# Altium PCB PCB1.PcbDoc (part 8 of 8)
Units mil, origin at the board's own origin, x right, y up, seen from the top; angles counter-clockwise.
Board outline 1968.5 x 1968.5 mil, 4 copper layers (Top Layer, Layer 1, Layer 2, Bottom Layer), stack 23.756 mil thick; 223 components, 143 nets, 652 pads, 329 vias.
Unrouted connection lines stored in the file: 15.
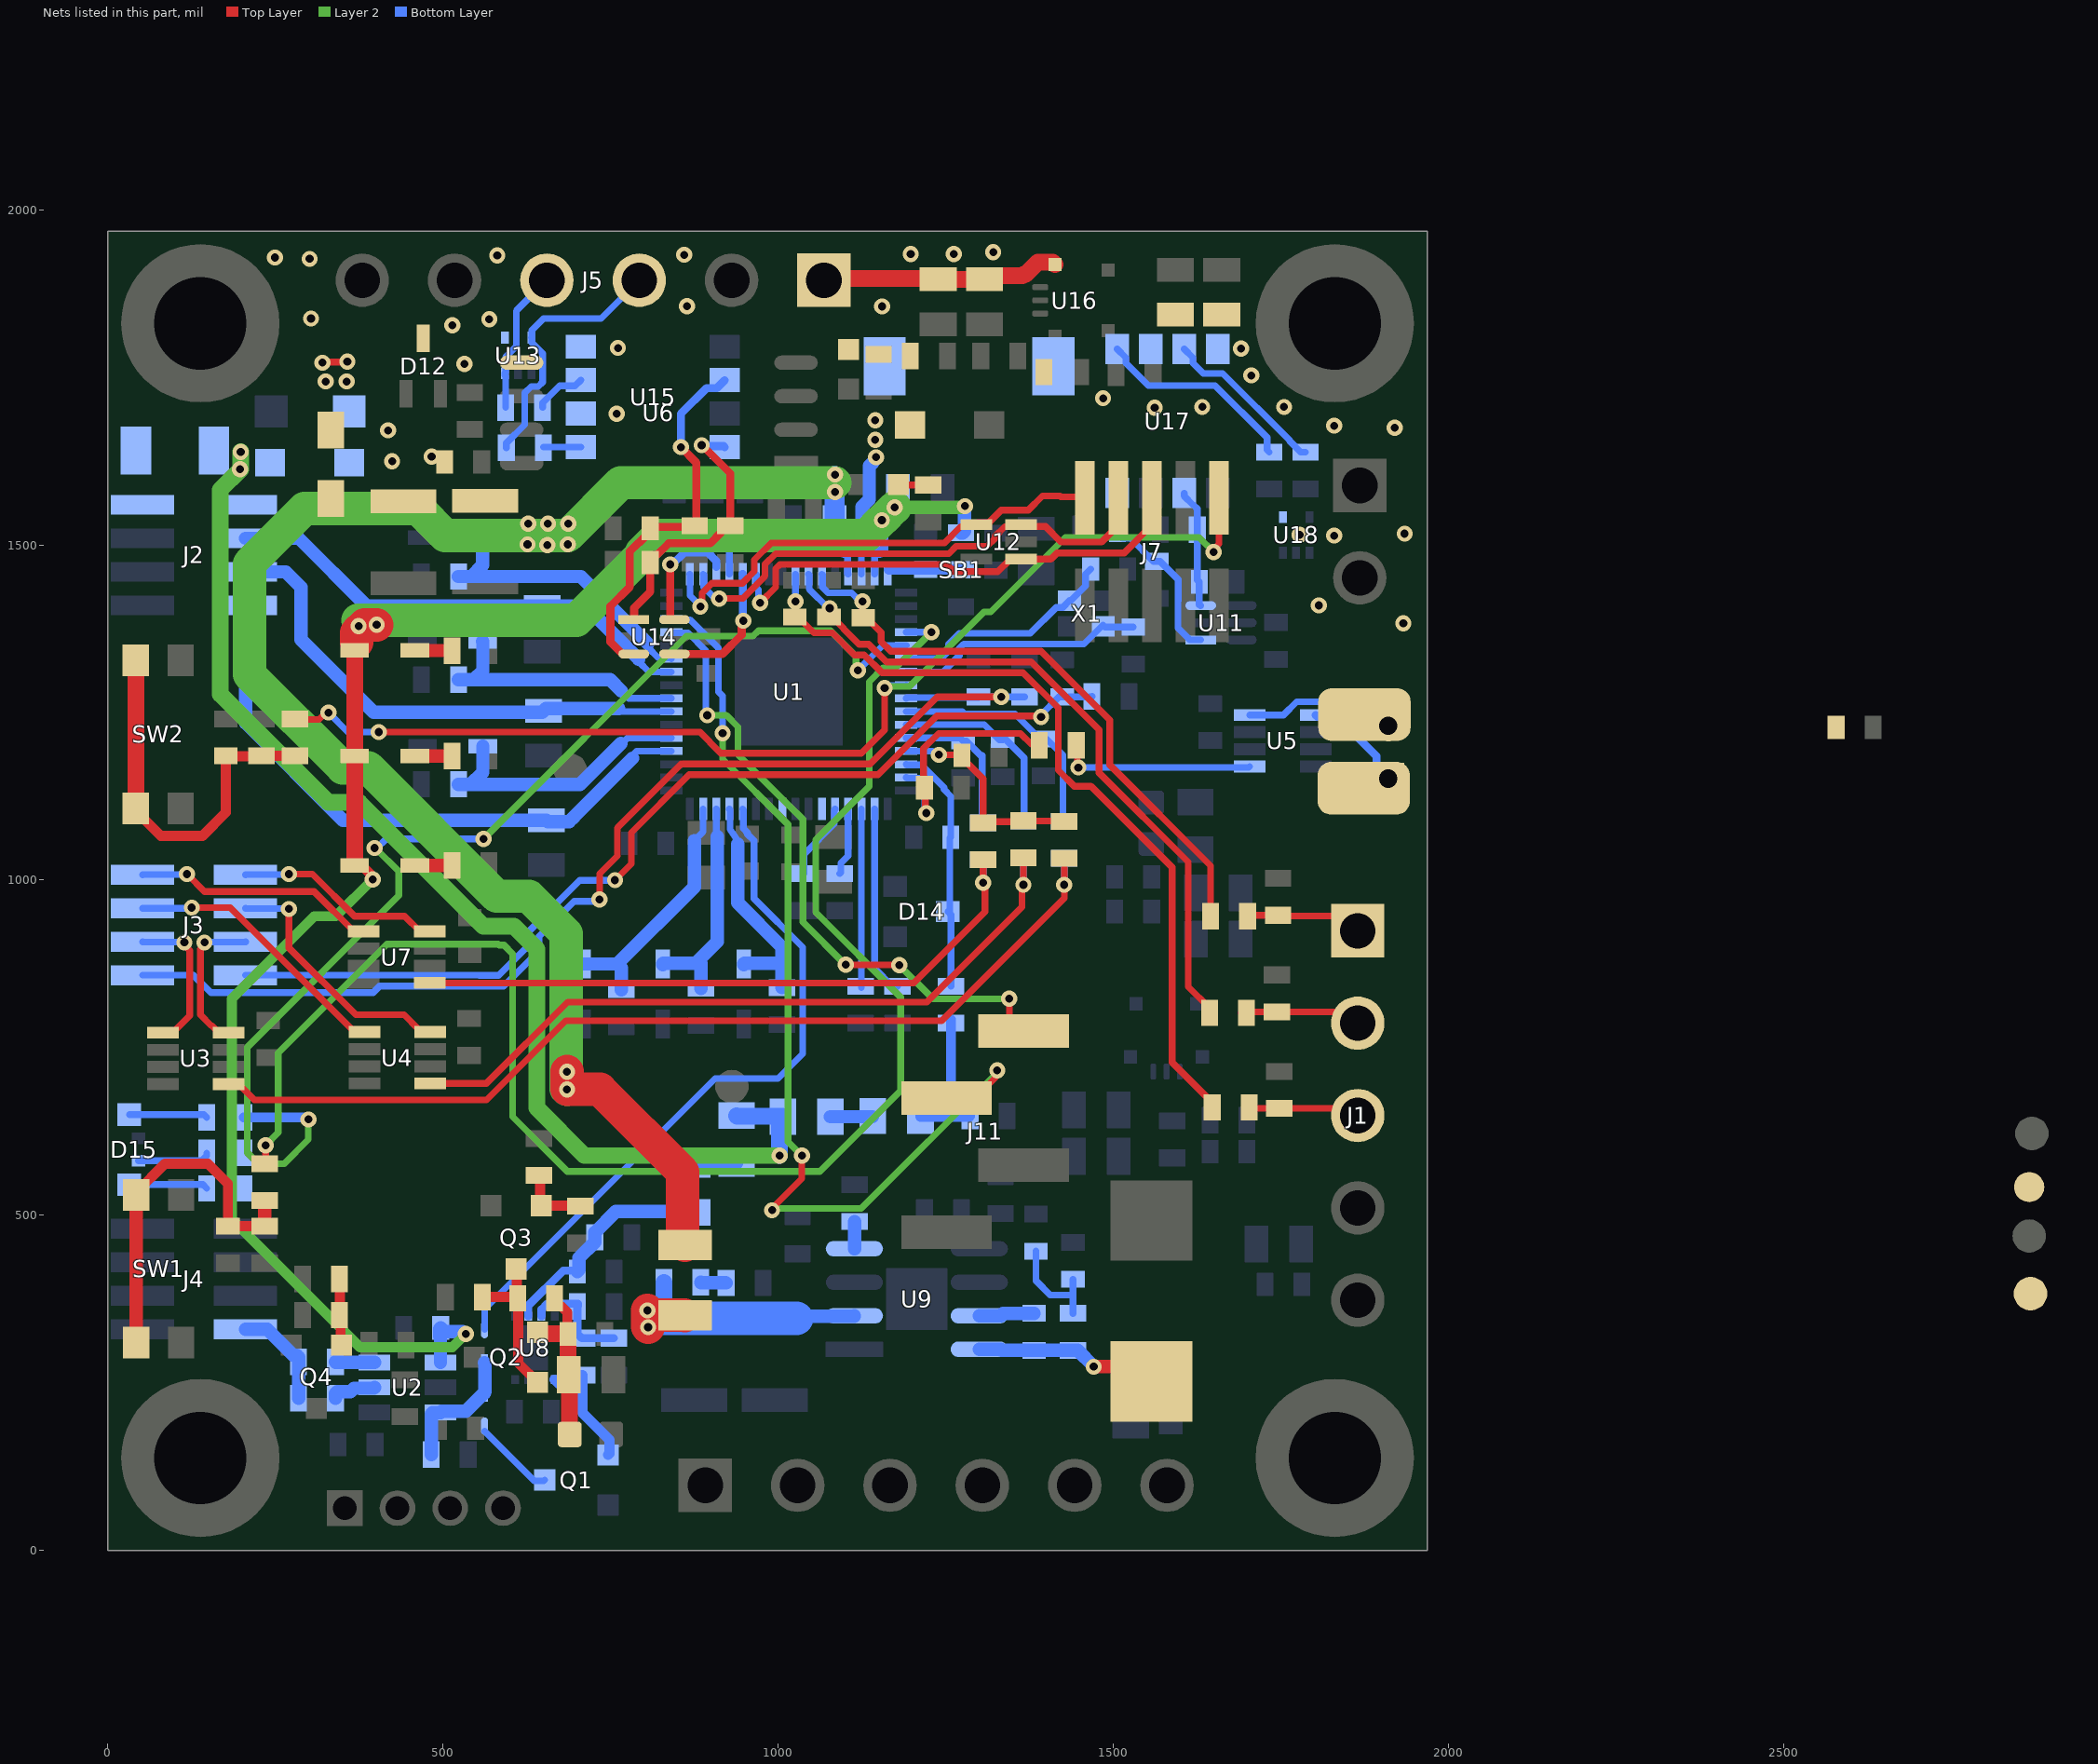
[diagram p5: the nets of this part, all layers, seen from the top]

## Via types
v1: diameter 24, hole 12, Top Layer to Bottom Layer, tented both sides, 329 vias

## Nets (pads, with @x,y where several pads share a name; then routed paths per layer and width w, separated by ;. In a path a pad name is that pad's centre, name@x,y a point inside that pad or via, vN(x,y) a via of type N, cw(c..) or ccw(c..) an arc to the next point about the centre after c; other vN are vias at no path point) (continued)
GND_EXT: C65.1 C66.1 C67.1 C68.1 C69.1 C70.1 D12.3 J5.1 R80.1 R81.1 TP6.1 U6.5 U13.4 U15.2 U15.4 U16.4 U17.2 U17.4 U18.4 | length 351.5
  Top Layer w25: J5.1@1068.39,1895 1070.85,1897.46 1238,1897.46 C66.1@1239,1896.46 ; C66.1@1240,1896.46 C67.1@1308,1896.46 ; C67.1@1314,1896.46 1319.22,1901.68 1364.48,1901.68 1366.89,1904.08 1369.56,1904.08 1387.62,1922.15 1409.84,1922.15 U16.4@1413.34,1918.64
  other v1: 1933,1383 1807,1410 1830,1514 1778,1515 1935,1517 424,1625 483,1632 418,1671 1920,1675 1830,1678 759,1696 1562,1705 1633,1706 1755,1706 1485,1719 1706,1753 532,1770 1691,1793 761,1794 514,1828 569,1837 303,1838 1155,1856 864,1856.5 301,1927 249,1929 581,1932 860,1933 1198,1934 1262,1934 1321,1937
GOV: J4.7 R62.1 R63.1 | length 157.6
  Bottom Layer w20: J4.7@205.27,330 237.75,330 277.07,290.69 281.84,290.69 284.44,288.09 R63.1@284.44,281 R62.1@284.44,227
HALL1_IN: J1.3 R44.1 R47.1 | length 167.1
  Top Layer w10: R47.1@1703,661 1704.56,659.44 1854.35,659.44 J1.3@1865,648.8
HALL2_IN: J1.2 R45.1 R48.1 | length 177.6
  Top Layer w10: R48.1@1691.56,802 1693,803.44 R45.1@1741,803.44 ; R45.1@1744.44,803.44 1829.28,803.44 1846.13,786.59 J1.2@1865,786.59
HALL3_IN: J1.1 R46.1 R49.1 | length 174.6
  Top Layer w10: R49.1@1700.56,946 1702,947.44 R46.1@1746,947.44 1747,946.44 1842.94,946.44 J1.1@1865,924.39
HSE_IN: C6.2 U1.6 X1.1 | length 346.9
  Bottom Layer w10: U1.6@1191.2,1330.41 1243.12,1330.41 1254.48,1341.77 1254.48,1352.34 1270.3,1368.16 1376.16,1368.16 1414.92,1406.92 1424.67,1406.92 X1.1@1434.92,1417.17 1436.89,1417.17 1458.84,1439.13 1458.84,1456.4 C6.2@1466.44,1464
HSE_OUT: C7.2 U1.7 X1.3 | length 375.2
  Bottom Layer w10: U1.7@1191.2,1310.73 1246.06,1310.73 1270.48,1335.14 1270.48,1345.71 1276.92,1352.16 1456.44,1352.16 1484.84,1380.56 1487.84,1377.56 C7.2@1530,1377.56
I_SENSE_A: C24.2 R23.2 U1.10 | length 355.6
  Bottom Layer w10: U1.10@1191.2,1251.67 1275.09,1251.67 1278.78,1247.99 1353.65,1247.99 1391.08,1210.56 C24.2@1396,1210.56 ; C24.2@1400.92,1210.56 1425,1186.48 1425,1089.56 R23.2@1427,1087.56
I_SENSE_B: C26.2 R25.2 U1.11 | length 286.3
  Bottom Layer w10: U1.11@1191.2,1231.99 1307.65,1231.99 1330.08,1209.56 C26.2@1335,1209.56 ; C26.2@1339.92,1209.56 1367,1182.48 1367,1088.56 R25.2@1366,1088.56
I_SENSE_C: C28.2 R26.2 U1.12 | length 225.8
  Bottom Layer w10: U1.12@1191.2,1212.3 1271.26,1212.3 C28.2@1276,1207.56 1280.92,1207.56 1302.52,1185.96 1304.52,1185.96 1304.52,1086.04 1305.52,1086.04 R26.2@1306,1085.56
IIN+: J10.2 pad.3@1875,1247 U5.8 | length 229.8
  Bottom Layer w10: U5.8@1703.79,1246.39 1754.18,1246.39 1774.03,1266.24 1835.76,1266.24 1871.63,1230.37 J10.2@1910.54,1230.37
IIN-: J10.1 pad.3@1874,1137 U5.1 | length 156.6
  Bottom Layer w12: U5.1@1802.21,1246.39 1804.66,1243.94 1833.7,1243.94 1892.92,1184.72 1892.92,1169.25 J10.1@1910.54,1151.63
INV_DRIVE_MCU: U1.53 U14.4 | length 203.8
  Top Layer w12: U14.4@845.32,1337.41 849.32,1337.41 916.94,1337.41 945.7,1366.17 945.7,1384.7 v1(948,1387)
  Bottom Layer w12: U1.53@947.1,1456.4 947.2,1456.3 947.2,1387.8 v1(948,1387)
INV_ENABLE_MCU: U1.51 U14.6 | length 178.9
  Top Layer w12: v1(839,1471) 839,1389.15 839.56,1388.59 U14.6@845.32,1388.59
  Bottom Layer w12: v1(839,1471) 842.25,1471 860.08,1488.83 895.22,1488.83 907.64,1476.41 U1.51@907.64,1467.13
JTAG_SWCLK: J7.4 U1.50 U12.3 | length 765.6
  Top Layer w10: v1(912.15,1420) 912.6,1420.45 947.45,1420.45 980.48,1453.48 980.48,1471.34 996.3,1487.16 1254.79,1487.16 1265.63,1498 1312,1498 1324,1510 1324,1513.15 1338.29,1527.43 1359.75,1527.43 U12.3@1362.62,1530.31 1365.21,1527.72 1398.95,1527.72 1422.47,1504.2 1482.43,1504.2 1508,1529.76 J7.4@1508,1570.12
  Bottom Layer w10: U1.50@888.05,1456.4 888.95,1455.49 888.95,1436.98 903.26,1422.68 909.47,1422.68 v1(912.15,1420)
JTAG_SWDIO: J7.2 U1.49 U12.4 | length 719
  Top Layer w10: v1(884,1408) 886.68,1410.68 886.68,1428.34 901.34,1443 946.85,1443 964.48,1460.63 964.48,1477.97 989.67,1503.16 1248.16,1503.16 1272.43,1527.43 1292.82,1527.43 1298.57,1533.18 1314.31,1533.18 1333.13,1552 1373.33,1552 1394.48,1573.15 1420.85,1573.15 1422.07,1571.93 1456.18,1571.93 J7.2@1458,1570.12
  Bottom Layer w10: U1.49@868.36,1456.4 868.54,1456.22 868.54,1424.66 884,1409.2 v1(884,1408)
JTAG_SWO: J7.6 U1.54 U12.1 | length 743.7
  Top Layer w10: v1(973.26,1413.74) 996.48,1436.95 996.48,1464.71 1002.92,1471.16 1251.84,1471.16 1262.75,1460.25 1328,1460.25 1346.87,1479.13 U12.1@1362.62,1479.13 1407.24,1479.13 1416.31,1488.2 1516.43,1488.2 1558,1529.76 J7.6@1558,1570.12
  Bottom Layer w10: U1.54@966.89,1456.4 967.69,1455.6 967.69,1436 970.58,1433.11 970.58,1416.42 v1(973.26,1413.74)
LED_BLUE: D15.3 R43.1 | length 109.1
  Bottom Layer w10: D15.3@45.62,581.27 139.84,581.27 147.44,588.87 R43.1@147.44,593
LED_GREEN: D15.4 R42.1 | length 118
  Bottom Layer w10: D15.4@31.84,545.83 141.61,545.83 R42.1@147.44,540
LED_RED: D15.1 R41.1 | length 117.3
  Bottom Layer w10: D15.1@31.84,650.17 143.28,650.17 R41.1@147.44,646
LM_BST: C8.2 U9.7 | length 83.3
  Bottom Layer w20: U9.7@1300.15,350 1332.28,350 1335.84,353.56 C8.2@1382,353.56
MCU_RESET: J7.10 R40.2 U1.8 | length 1697.9
  Top Layer w10: R40.2@279,1240.56 279.78,1239.78 314.99,1239.78 325.21,1250 v1(329,1250) ; v1(404,1221) 883.38,1221 898.54,1205.84 898.54,1205.38 914.6,1189.32 1124.32,1189.32 1159,1224 v1(1159,1286.47) ; v1(1649.87,1489.65) 1649.87,1493.44 1658,1501.56 J7.10@1658,1570.12
  Layer 2 w10: v1(1159,1286.47) 1161.68,1289.15 1196.11,1289.15 1307.28,1400.33 1317.56,1400.33 1428.74,1511.5 1628.02,1511.5 v1(1649.87,1489.65)
  Bottom Layer w10: v1(329,1250) 358,1221 v1(404,1221) ; v1(1159,1286.47) 1162.79,1286.47 1166.45,1290.14 1190.29,1290.14 U1.8@1191.2,1291.04
NetC10_2: C10.2 C11.2 F2.2 R12.2 U9.2 | length 422.9
  Top Layer w50: v1(805,358) 805,334 v1(806,333) ; v1@812,351 860.5,351 F2.2@861,350.5
  Bottom Layer w20: C11.2@1043,349.44 1113.29,349.44 U9.2@1113.85,350
  Bottom Layer w25: R12.2@829.44,400 829.44,350.58 C10.2@834,346.02
  Bottom Layer w50: 806.66,346.02 834,346.02 C10.2@875.02,346.02 C11.2@995.02,346.02 ; C11.2@995.02,346.02 C11.2@1028,346
NetC12_1: C12.1 C13.2 R13.1 | length 159
  Bottom Layer w10: C13.2@1385,446.44 1385,402 1406,381 1440,381 ; R13.1@1440,353.56 1440,381 ; C12.1@1440,404.44 1440,381
NetC29_2: C29.2 R27.2 U1.15 | length 364.3
  Top Layer w10: v1(1221,1100) 1219.72,1101.28 1219.72,1136.72 C29.2@1218.44,1138 1218.44,1141 1217,1142.44 1217,1196.53 1239.47,1219 1361.6,1219 1377.7,1202.9 1387.98,1202.9 R27.2@1389.88,1201
  Bottom Layer w10: U1.15@1191.2,1153.25 1192.1,1152.34 1210.61,1152.34 1218.93,1144.02 1218.93,1102.07 v1(1221,1100)
NetC40_1: C40.1 R37.1 R39.1 SW1.B1 SW1.B2 | length 548.1
  Top Layer w15: SW1.B1@42.2,530.24 42.2,534.17 85.02,577 149,577 179,547 C40.1@179,483.56 189.02,483.56 R37.1@234,483.56
  Top Layer w20: SW1.B2@42.2,309.76 SW1.B1@42.2,530.24 ; R37.1@234,483.56 R39.1@234,521.88
NetC41_1: C41.1 R38.1 R40.1 SW2.B1 SW2.B2 | length 576.7
  Top Layer w15: SW2.B2@41.54,1107.26 41.54,1103.33 78.86,1066 141,1066 176,1101 C41.1@176,1185.44 176.5,1184.94 229,1184.94 229.5,1185.44 R40.1@279,1185.44
  Top Layer w25: SW2.B2@41.54,1107.26 SW2.B1@41.54,1327.74
NetC42_2: C42.2 R47.2 U1.57 | length 1219.4
  Top Layer w10: v1(1026,1416) 1026,1393.44 C42.2@1025,1392.44 1029.92,1392.44 1053.52,1368.84 1081.16,1368.84 1114,1336 1128.53,1336 1155.05,1309.47 1365.53,1309.47 1418,1257 1418,1164 1442,1140 1467,1140 1588,1019 1588,727.97 1647.88,668.09 R47.2@1647.88,661
  Bottom Layer w10: U1.57@1025.84,1456.4 1025.92,1456.32 1025.92,1416.08 v1(1026,1416)
NetC43_2: C43.2 R48.2 U1.58 | length 1042.3
  Top Layer w10: v1(1077,1405.66) 1076,1404.66 C43.2@1076,1392.44 1080.92,1392.44 1097.85,1375.51 1097.85,1374.91 1120.77,1352 1135.15,1352 1161.68,1325.47 1377.9,1325.47 1479,1224.37 1479,1160 1612,1027 1612,840.97 1643.88,809.09 R48.2@1643.88,802
  Bottom Layer w10: U1.58@1045.53,1456.4 1046.43,1455.49 1046.43,1434.04 1074.81,1405.66 v1(1077,1405.66)
NetC44_2: C44.2 R49.2 U1.59 | length 907.7
  Top Layer w10: v1(1126,1415.96) 1126,1392.44 C44.2@1127,1391.44 1131.92,1391.44 1153.91,1369.45 1153.91,1355.87 1168.31,1341.47 1392.53,1341.47 1495,1239 1495,1172 1645.44,1021.56 R49.2@1645.44,946
  Bottom Layer w10: U1.59@1065.21,1456.4 1066.12,1455.49 1066.12,1436.98 1074.44,1428.66 1109.51,1428.66 1122.21,1415.96 v1(1126,1415.96)
NetC46_2: C46.2 R59.1 R61.2 U8.2 | length 339
  Bottom Layer w12: U8.2@627.16,349.24 627.25,349.34 627.25,365.19 679.19,417.13 699.31,417.13 C46.2@700.44,416
  Bottom Layer w20: C46.2@700.44,416 703.04,418.6 703.04,436.51 726.44,459.91 726.44,474.09 757.84,505.49 871,505.49 R59.1@872,504.49
NetC56_1: C56.1 C57.2 L4.2 Q2.2 R64.1 | length 261.5
  Top Layer w15: R64.1@666.56,376 666.56,368.91 671.66,363.81 676.74,363.81 685.53,355.03 685.53,323.91 C57.2@686.44,323
  Top Layer w25: Q2.2@641.24,325.4 643.65,323 C57.2@686.44,323 686.54,322.9 686.54,262 688.32,260.22 688.32,173.78 L4.2@689.09,173
NetC61_1: C61.1 R72.1 U11.3 U17.6 | length 179.1
  Bottom Layer w10: U17.6@1606,1577.52 1606,1572.99 1618.91,1560.08 1619.7,1560.08 1625.56,1554.22 R72.1@1625.56,1523 1625.56,1447.88 C61.1@1628.44,1445 1628.44,1411.08 1629.93,1409.59 U11.3@1630.68,1409.59
NetC62_1: C62.1 R75.1 U14.3 U15.6 | length 569.2
  Top Layer w12: U14.3@784.68,1337.41 784.45,1337.64 767.42,1337.64 749.77,1355.29 749.77,1408.48 778.68,1437.38 778.68,1490.57 791.63,1503.52 792.64,1503.52 809.2,1520.08 C62.1@809.2,1525 810.96,1526.76 873.7,1526.76 R75.1@875.46,1528.52 875.46,1532.58 878,1535.12 878,1623 v1(855,1646)
  Bottom Layer w12: v1(855,1646) 855,1696 893.09,1734.09 908.57,1734.09 U15.6@920.48,1746
NetC63_1: C63.1 R74.1 U14.1 U15.8 | length 416.4
  Top Layer w12: U14.1@784.68,1388.59 785.17,1389.08 785.17,1406.17 809.2,1430.2 809.2,1478.92 815.79,1485.52 819.58,1485.52 836.52,1502.47 898.66,1502.47 914.77,1518.58 914.77,1521.92 921.37,1528.52 R74.1@928.46,1528.52 928.46,1607.08 886.55,1648.99 v1(885.95,1648.99)
  Bottom Layer w12: v1(885.95,1648.99) 887.45,1647.49 918.99,1647.49 U15.8@920.48,1646
NetC71_1: C71.1 R73.1 U11.1 U17.8 | length 293.1
  Bottom Layer w10: U17.8@1506,1577.52 1506.56,1576.96 1506.56,1517.39 1514.16,1509.79 1525.85,1509.79 1560.08,1475.56 1569.92,1475.56 1597,1448.48 1597,1417.12 1596.77,1416.89 1596.77,1376.71 1597,1376.47 1597,1375.79 1614.38,1358.41 U11.1@1630.68,1358.41
NetD1_1: D1.1 R3.1 U1.43 | length 442.8
  Bottom Layer w10: 797.77,1354.94 797.77,1360.77 ; 805.53,1353.01 805.53,1347.18 821.39,1331.32 839.9,1331.32 U1.43@840.8,1330.41
  Bottom Layer w20: R3.1@523,1453 542,1453 ; D1.1@558.88,1511 558.88,1469.88 542,1453 ; 805.53,1353.01 797.77,1360.77 705.54,1453 542,1453
NetD2_1: D2.1 R4.1 U1.40 | length 392
  Bottom Layer w10: 766.23,1282 776.87,1271.36 U1.40@840.8,1271.36
  Bottom Layer w20: R4.1@523,1299 546,1299 ; D2.1@558.88,1356 559.32,1355.56 559.32,1312.32 546,1299 ; 766.23,1282 749.23,1299 546,1299
NetD4_1: D4.1 R5.1 U1.37 | length 411.6
  Bottom Layer w10: 765.5,1204 767,1204 775.3,1212.3 U1.37@840.8,1212.3
  Bottom Layer w20: R5.1@523,1142.6 541.16,1142.6 ; D4.1@559.32,1200 559.32,1160.76 541.16,1142.6 ; 765.5,1204 704.1,1142.6 541.16,1142.6
NetD5_1: D5.1 R6.1 | length 55.6
  Top Layer w20: D5.1@457.88,1022 R6.1@513.44,1022
NetD6_1: D6.1 R7.1 | length 55.6
  Top Layer w20: D6.1@457.88,1185 R7.1@513.44,1185
NetD7_1: D7.1 R8.1 | length 56
  Top Layer w20: D7.1@457.88,1343 458.38,1342.5 512.94,1342.5 R8.1@513.44,1342
NetD8_1: D8.1 R9.1 U1.31 | length 374.9
  Bottom Layer w10: 875,1059 888.05,1072.05 U1.31@888.05,1106
  Bottom Layer w20: D8.1@710,874.88 759.88,874.88 ; R9.1@766,836.56 766,868.76 759.88,874.88 ; 875,1059 875,990 759.88,874.88
NetD9_1: D9.1 R10.1 U1.30 | length 340
  Bottom Layer w10: U1.30@907.73,1106 907.73,1066.27 909.2,1064.8
  Bottom Layer w20: D9.1@828,873.88 828,875.06 828.83,875.88 885,875.88 R10.1@885,838.56 ; 876.88,875.88 909.2,908.2 909.2,1064.8
NetD10_1: D10.1 R11.1 U1.29 | length 356.5
  Bottom Layer w10: U1.29@927.42,1106 928.32,1105.1 928.32,1075.68 942.06,1055.35 941.39,1055.35 939.6,1053.56
  Bottom Layer w20: 939.6,1053.56 939.86,1053.3 939.86,966.14 1006,900 1006,875.88 R11.1@1006,839.56 ; D10.1@949,873.88 949,875.06 949.83,875.88 1004,875.88
NetD11_2: D11.2 R21.2 | length 44.7
  Top Layer w10: D11.2@1179.53,1590 1179.97,1589.56 R21.2@1224,1589.56
NetD13_2: D13.2 R24.2
NetD16_2: D16.2 Q1.3 | length 120.5
  Bottom Layer w10: D16.2@562.34,177.58 636.17,103.75 650.5,103.75 Q1.3@651.76,105
NetD20_1: D20.1 D22.1 FB1.1 | length 37.9
  Top Layer w10: v1(320,1772) 320.89,1772.89 356.25,1772.89 v1(357.13,1773.78)
  other v1: 325,1744 356,1744
NetF1_1: F1.1 J2.1 J2.2
NetJ5_3: J5.3 R76.1 U13.5 | length 402.6
  Bottom Layer w10: R76.1@594.44,1645 594.44,1652.09 622,1679.65 622,1727 631.57,1736.57 642.15,1736.57 648.59,1743.01 648.59,1785.86 632.59,1801.86 632.59,1808.67 U13.5@631.68,1809.57 632.59,1810.48 632.59,1820.59 650,1838 735.8,1838 J5.3@792.8,1895
NetJ5_4: J5.4 R77.1 U13.3 | length 216.4
  Bottom Layer w10: R77.1@593.44,1705 593.44,1752.35 592.32,1753.47 U13.3@592.32,1756.43 593.22,1757.33 593.22,1780.16 609.22,1796.16 609.22,1849.22 J5.4@655,1895
NetQ1_1: Q1.1 R56.2 U8.5 | length 185.5
  Bottom Layer w15: U8.5@666.53,254.76 683.26,238.02 683.75,238.02 686.64,235.13 707.37,235.13 ; R56.2@708,261.44 708,232.76 708,205.24 748.24,165 748.24,144.4 Q1.1@746.24,142.4
NetQ2_1: Q2.1 Q3.3 R64.2 R78.1 | length 237
  Top Layer w15: R78.1@558.56,378 609.44,378 R64.2@611.44,376 ; Q3.3@609,419.76 610.22,418.54 610.22,377.22 R64.2@611.44,376 ; R64.2@611.44,368.91 R64.2@612,368.36 ; Q2.1@641.24,250.6 612,279.85 612,375.44 R64.2@611.44,376
NetQ3_1: Q3.1 R65.2 R66.1 | length 105.5
  Top Layer w15: R65.2@643,559.44 644.7,557.74 644.7,515.94 Q3.1@646.4,514.24 704.32,514.24 R66.1@705,513.56
NetQ4_1: Q4.1 R67.2 R68.1 | length 100.3
  Top Layer w15: R67.2@346.59,404.93 346.08,404.41 346.08,351.52 R68.1@345.56,351 346.98,349.58 346.98,307.67 Q4.1@348.4,306.24
NetR12_1: R12.1 R15.2 | length 38.3
  Bottom Layer w20: R12.1@884.56,400 885.06,399.5 921.94,399.5 R15.2@922.44,399
NetR27_1: R27.1 U5.5 | length 290.7
  Top Layer w10: R27.1@1445,1201 1446.5,1199.5 1446.5,1169.5 v1(1448,1168)
  Bottom Layer w10: v1(1448,1168) 1702.17,1168 U5.5@1703.79,1169.61
NetR33_1: R33.1 R34.2 | length 63.9
  Bottom Layer w10: R34.2@1140.49,647 R34.2@1141.49,648
  Bottom Layer w20: R33.1@1078,647 R34.2@1140.49,647
NetR34_1: R34.1 R35.1 R36.2 TP3.1 | length 220.2
  Bottom Layer w15: R34.1@1212.51,648 1212.51,647 1258,647 ; R35.1@1258,791.88 1258,647 ; R36.2@1286.44,648 1285.44,647 1258,647
NetR50_1: R50.1 U1.18 | length 282.7
  Bottom Layer w10: U1.18@1143.95,1106 1143.95,868.52 1170.91,841.56 R50.1@1178,841.56
NetR51_1: R51.1 U1.20 | length 101.7
  Bottom Layer w10: R51.1@1092,1009.56 1093.68,1011.24 1093.68,1025.32 1104.58,1036.21 U1.20@1104.58,1106
NetR52_2: R52.2 U1.21 | length 115.5
  Bottom Layer w10: R52.2@1039,1009.56 1039,1039 1083.99,1083.99 1083.99,1105.1 U1.21@1084.9,1106
NetR53_1: R53.1 U1.19 | length 266.2
  Bottom Layer w10: R53.1@1124.27,839.83 U1.19@1124.27,1106
NetR55_2: R55.2 R56.1 R57.1 U8.3 | length 167.8
  Bottom Layer w12: U8.3@646.84,349.24 646.94,349.34 646.94,359.42 655.65,368.13 701.31,368.13 701.31,364.87 R57.1@700.44,364 700.44,323.16 707.04,316.56 R56.1@708,316.56 ; R56.1@711,316.56 726.72,316.56 R55.2@755,316.56
NetR58_1: R58.1 R59.2 | length 66.8
  Bottom Layer w20: R59.2@872,575.51 872.99,576.5 937.01,576.5 R58.1@938,577.49
NetR62_2: R62.2 U2.5 | length 69
  Bottom Layer w20: R62.2@339.56,227 339.56,234.09 342.16,236.69 361.69,236.69 367,242 396.79,242 U2.5@397.79,243
NetR63_2: R63.2 U2.6 | length 58.5
  Bottom Layer w20: R63.2@339.56,281 339.86,280.7 397.49,280.7 U2.6@397.79,280.4
NetR76_2: R76.2 U15.1 | length 56
  Bottom Layer w10: R76.2@649.56,1646 U15.1@705.52,1646
NetR77_2: R77.2 U15.3 | length 78.1
  Bottom Layer w10: R77.2@648.56,1705 648.56,1712.09 673.94,1737.46 696.98,1737.46 U15.3@705.52,1746
NetR82_2: R82.2 U17.1 | length 306.2
  Bottom Layer w10: U17.1@1506,1792.48 1518.91,1779.57 1518.91,1771.57 1552.48,1738 1652,1738 1729.7,1660.3 1729.7,1641.86 R82.2@1733,1638.56
NetR83_2: R83.2 U17.3 | length 250
  Bottom Layer w10: U17.3@1606,1792.48 1618.91,1779.57 1618.91,1771.57 1634.48,1756 1663.4,1756 1763.69,1655.71 1763.69,1654.79 1779.91,1638.56 R83.2@1787,1638.56
NTC: C38.2 J3.8 R32.2 U1.9 | length 1712.3
  Top Layer w10: v1(733.6,971.08) 733.6,1009.53 760,1035.92 760,1078 855.32,1173.32 1137.32,1173.32 1237.44,1273.44 v1(1333.09,1273.44)
  Bottom Layer w10: J3.8@51.73,858.03 127.71,858.03 153.47,832.27 395.71,832.27 405.45,842 590.73,842 643,894.27 643,916 695.4,968.4 730.92,968.4 v1(733.6,971.08) ; U1.9@1191.2,1271.36 1192.1,1272.26 1299,1272.26 1300.18,1273.44 v1(1333.09,1273.44) R32.2@1368,1273.44
OCP: C36.2 R28.1 R29.1 R30.1 U1.13 | length 323.6
  Top Layer w10: v1(1240,1187) 1273.44,1187 C36.2@1274.44,1186 1274.44,1181.08 1282.04,1173.48 1283.75,1173.48 1306,1151.23 R30.1@1306,1085.56 ; R30.1@1307,1085.56 1308.5,1087.06 1364.5,1087.06 R29.1@1366,1088.56 ; R29.1@1365,1089.56 1366.5,1088.06 1426.5,1088.06 R28.1@1427,1087.56
  Bottom Layer w10: U1.13@1191.2,1192.62 1230.59,1192.62 1236.21,1187 v1(1240,1187)
OUT1: C3.1 J2.3 U1.42 | length 720.3
  Bottom Layer w10: 791.88,1329.88 791.88,1326.12 807.27,1310.73 U1.42@840.8,1310.73
  Bottom Layer w20: J2.3@205.27,1510 285,1510 386,1409 648,1409 712.77,1409 791.88,1329.88
OUT2: C4.1 J2.5 U1.39 | length 772.1
  Bottom Layer w10: 762.33,1256 766.66,1251.67 U1.39@840.8,1251.67
  Bottom Layer w20: J2.5@205.27,1460 265,1460 288,1437 288,1359 396.54,1250.46 648,1250.46 653.54,1256 762.33,1256
OUT3: C5.1 J2.7 U1.36 | length 918.6
  Bottom Layer w10: 782.95,1182.05 782.95,1186.76 788.81,1192.62 U1.36@840.8,1192.62
  Bottom Layer w20: J2.7@205.27,1410 205.27,1234.73 350.54,1089.46 C5.1@654,1089.46 656.46,1087 688,1087 696.04,1095.04 696.04,1095.13 782.95,1182.05
OV: D16.1 D17.1 R60.1 U2.3 | length 198.8
  Bottom Layer w20: R60.1@482.44,143 482.44,203.64 484.4,205.6 U2.3@496.21,205.6 498.02,207.41 534.08,207.41 561.34,234.67 D16.1@562,234.67 562,236.15 562.5,236.65 562.5,279.5 D17.1@562,280
OV_ON: D17.2 U1.28 | length 1065.5
  Bottom Layer w10: D17.2@562,329.33 562,360 906,704 1000,704 1036.69,740.69 1036.69,899.94 964,972.62 964,1058.85 954.5,1068.35 954.5,1070.5 948.01,1076.99 948.01,1105.1 U1.28@947.1,1106
REGIN: C51.1 SB1.2 U1.64 | length 108
  Bottom Layer w15: U1.64@1165.23,1463.44 C51.1@1220,1463.44 1220.22,1463.22 1272.78,1463.22 SB1.2@1273,1463
RON: R16.2 U9.4 | length 40.5
  Bottom Layer w20: U9.4@1113.85,450 1114,450.15 R16.2@1114,490.44
SCREF: C1.2 R1.1 R2.2 U1.52 | length 181.5
  Bottom Layer w10: C1.2@845,1519.44 R2.2@899,1519.44 902,1522.44 927.42,1522.44 ; U1.52@927.42,1456.4 927.42,1522.44 ; R1.1@958,1519.44 955,1522.44 927.42,1522.44
SOA: R23.1 R28.2 U3.5 | length 1480.1
  Top Layer w10: U3.5@180.21,695.61 194.98,695.61 218.59,672 565,672 683,790 1244,790 1427,973 R28.2@1427,1032.44
  Bottom Layer w10: v1(1427,993) R23.1@1427,1032.44
SOB: R25.1 R29.2 U4.5 | length 1106.6
  Top Layer w10: U4.5@481.21,696.61 564.61,696.61 686,818 1222,818 1364,960 1364,991 v1(1366,993) R29.2@1366,1033.44
  Bottom Layer w10: v1(1366,993) R25.1@1366,1033.44
SOC: R26.1 R30.2 U7.5 | length 985.7
  Top Layer w10: U7.5@480.21,846.61 1202.61,846.61 1308.68,952.68 1308.68,993.32 v1(1306,996) R30.2@1306,1030.44
  Bottom Layer w10: v1(1306,996) R26.1@1306,1030.44
STATUS_LED_BLUE: R43.2 U1.22
STATUS_LED_GREEN: R42.2 U1.25
STATUS_LED_RED: R41.2 U1.5 | length 1781.9
  Layer 2 w10: v1(299,643) 299,613 263,577 224.28,577 208,593.28 208,751 434,977 434,1013 399,1048 v1(398,1048) ; v1(560.45,1061.46) 862.99,1364 962.53,1364 970.53,1372 1078,1372 1116.32,1333.68 1116.32,1315.68 v1(1119,1313)
  Bottom Layer w10: v1(398,1048) 401.79,1048 415.25,1061.46 v1(560.45,1061.46) ; v1(1119,1313) 1156.1,1350.1 U1.5@1191.2,1350.1
  Bottom Layer w15: R41.2@202.56,646 293.56,646 296.56,643 v1(299,643)
SW: C8.1 L2.1 R13.2 U9.8 | length 277.1
  Top Layer w20: v1(1471,274) 1534.92,274 L2.1@1557,251.92
  Bottom Layer w20: U9.8@1300.15,300 1332.28,300 1333.84,298.44 C8.1@1382,298.44 R13.2@1440,298.44 1447.09,298.44 1471,274.53 v1(1471,274)
SW_STS: D3.1 L1.1 U1.62 | length 173.7
  Bottom Layer w10: U1.62@1124.27,1456.4 1124.27,1494.25 1125,1494.98
  Bottom Layer w20: 1125,1494.98 1125,1557 1136,1568 1136,1617.82 v1@1141.22,1623.04
  other v1: 1146,1631 1145,1657 1145,1686
TP: C37.2 J3.7 R31.2 | length 1478.1
  Top Layer w10: v1(756.6,1000) 781,1024.4 781,1071 867.32,1157.32 1149.32,1157.32 1237,1245 1390.89,1245 v1(1392.42,1243.47)
  Bottom Layer w10: J3.7@205.27,858.03 554.12,858.03 ; 554.15,858 583,858 627,902 627,922.63 703.98,999.6 756.21,999.6 v1(756.6,1000) ; v1(1392.42,1243.47) 1392.42,1246.78 1419.08,1273.44 1467.88,1273.44 R31.2@1468.44,1274
UART_RX: J11.2 U1.46 | length 1518.1
  Top Layer w10: v1(991,507.5) 991,510 1035.5,554.5 v1(1035.5,589) ; J11.2@1251.5,675 1294,675 1324.32,705.32 1324.32,713.32 v1(1327,716)
  Layer 2 w10: v1(917.29,1219.16) 917.29,1180.71 1014.95,1083.05 1014.95,609.55 v1(1035.5,589) ; v1(991,507.5) 993.5,510 1124,510 1327,713 v1(1327,716)
  Bottom Layer w10: U1.46@840.8,1389.47 841.71,1388.56 868.69,1388.56 911,1346.25 911,1281.08 917.29,1274.79 v1(917.29,1219.16)
UART_TX: J11.1 U1.45 | length 957.7
  Top Layer w10: v1(1101,874) 1101.5,873.5 1180.5,873.5 v1(1181,873) ; v1(1345,823) 1345,795 1365,775 J11.1@1366.5,775
  Layer 2 w10: v1(894.29,1246) 922.97,1246 940.29,1228.68 940.29,1187.34 1016.32,1111.32 1037,1090.63 1037,937.37 1100.37,874 v1(1101,874) ; v1(1181,873) 1231,823 v1(1345,823)
  Bottom Layer w10: U1.45@840.8,1369.78 841.71,1368.88 865.75,1368.88 892,1342.63 892,1248.29 v1(894.29,1246)
USER_BUTTON: R39.2 U1.4 | length 2359.5
  Top Layer w10: R39.2@234,577 235.16,578.16 v1(235.16,604.42)
  Layer 2 w10: v1(235.16,604.42) 254,623.26 254,742.23 416.27,904.5 582.5,904.5 584,903 591,903 604,890 604,647 685.5,565.5 1062.5,565.5 1182.86,685.86 1182.86,825.14 1056,952 1056,1060 1136,1140 1136,1296 1157,1317 1175.85,1317 v1(1228.92,1370.08)
  Bottom Layer w10: U1.4@1191.2,1369.78 1191.34,1369.93 1228.78,1369.93 v1(1228.92,1370.08)
VBUS: C39.2 D14.3 R35.2 U1.14 | length 373.8
  Bottom Layer w10: U1.14@1191.2,1172.93 1192.1,1172.03 1213.55,1172.03 1247.48,1138.1 1247.48,1135.29 1257.56,1125.21 C39.2@1257.56,1064 1256.37,1062.81 D14.3@1256.37,953 ; D14.3@1253.37,953 1258,948.37 1258,847 R35.2@1258,841.56
VCC: C19.1 C48.2 D5.2 D6.2 D7.2 L1.2 SB1.3 U1.63 U2.1 | length 2670.8
  Top Layer w15: D5.2@368.12,1022 378.65,1022 393.28,1007.37 393.28,1002.72 v1(395,1001)
  Top Layer w25: D5.2@368.12,1030 D6.2@368.12,1185 D7.2@368.12,1334
  Top Layer w50: 371,1355 371,1369 383,1381 v1(401,1381)
  Layer 2 w15: v1(395,1001) 340,946 308,946 185,823 185,494 376,303 386.49,303 386.57,302.92 425.09,302.92 425.18,303 514,303 v1(534,323)
  Layer 2 w20: v1(1174,1556) 1275.92,1556 1277.92,1558 v1(1279,1558)
  Layer 2 w50: v1@373,1388 401,1388 699,1388 796,1485 796,1488.81 821.19,1514 1131.75,1514 v1(1154.75,1537) ; v1@1156.19,1538.19 v1(1174,1556)
  Bottom Layer w10: U1.63@1143.95,1456.4 1143.95,1483.95 1151,1491
  Bottom Layer w20: U2.1@496.21,280.4 496.21,318.23 495.16,319.28 495.16,330.6 C48.2@496.56,332 499.16,329.4 499.16,326.52 529.39,326.52 532.92,323 v1(534,323) ; 1151,1491 1154.75,1494.75 v1(1154.75,1537) 1155.51,1537.77 1155.51,1539.05 1173.54,1557.08 1174,1556.61 v1(1174,1556) ; SB1.3@1273,1518.12 1275.64,1518.12 1278.23,1520.72 1278.23,1557.23 v1(1279,1558)
  other v1: 374,1379
VM: C2.2 C20.2 C21.1 F2.1 FB1.2 U1.61 | length 2491
  Top Layer w50: v1(685,714.14) v1(685,687.69) 734.31,687.69 857.7,564.3 857.7,458.8 F2.1@861,455.5
  Layer 2 w50: v1(685,687.69) 684,688.69 684,920 628,976 580,976 388.5,1167.5 350.5,1167.5 211,1307 211,1472 293.5,1554.5 462.84,1554.5 503.34,1514 686,1514 765,1593 1085,1593
  Bottom Layer w10: 1099,1487.33 1103.68,1482.65 1103.68,1457.3 U1.61@1104.58,1456.4
  Bottom Layer w20: C21.1@1084.46,1522.16 1099,1507.62 1099,1491
  Bottom Layer w30: C21.1@1084.46,1532 v1@1084.46,1603.46
  other v1: 655.5,1500 626,1501 686,1501 627,1532 656.5,1532 687,1532 1085,1579 1085,1605
VM_SENSE: D22.2 F1.2 R33.2 R58.2 | length 1762.5
  Layer 2 w25: v1(198,1639) 198,1613 167.5,1582.5 167.5,1277.5 329,1116 375,1116 560,931 606,931 640,897 640,660 711,589 v1(1002.27,589)
  Bottom Layer w25: R58.2@938,648.51 938.76,647.76 1006.22,647.76 R33.2@1006.98,647 1002.27,642.29 v1(1002.27,589)
  other v1: 197,1613
VS1N: J3.6 U3.1 | length 225.9
  Top Layer w10: U3.1@81.79,772.39 96.55,772.39 122,797.83 122,895.21 114,903.21 v1(114,907)
  Bottom Layer w10: J3.6@51.73,908.03 52.24,907.52 113.48,907.52 v1(114,907)
VS1P: J3.5 U3.8 | length 225.4
  Top Layer w10: v1(144,907) 144,903.21 138,897.21 138,799 153.68,783.32 154.52,783.32 165.45,772.39 U3.8@180.21,772.39
  Bottom Layer w10: v1(144,907) 144.52,907.52 204.76,907.52 J3.5@205.27,908.03
VS2N: J3.4 U4.1 | length 408.3
  Top Layer w10: v1(125,959) 182.41,959 368.02,773.39 U4.1@382.79,773.39
  Bottom Layer w10: J3.4@51.73,958.03 118.03,958.03 119,959 v1(125,959)
VS2P: J3.3 U4.8 | length 387.1
  Top Layer w10: v1(270,957) 270,899 370,799 442,799 462.59,778.41 462.59,777.24 466.45,773.39 U4.8@481.21,773.39
  Bottom Layer w10: J3.3@205.27,958.03 205.79,957.52 269.48,957.52 v1(270,957)
VS3N: J3.2 U7.1 | length 365.9
  Top Layer w10: v1(118,1009) 144,983 307.41,983 367.02,923.39 U7.1@381.79,923.39
  Bottom Layer w10: J3.2@51.73,1008.03 52.21,1008.52 117.52,1008.52 v1(118,1009)
VS3P: J3.1 U7.8 | length 310.8
  Top Layer w10: v1(270,1009) 305,1009 368,946 442.83,946 465.45,923.39 U7.8@480.21,923.39
  Bottom Layer w10: J3.1@205.27,1008.03 205.76,1008.52 269.52,1008.52 v1(270,1009)
pads on no net: J7.7 J7.8 U1.3 U1.33 U1.34 U1.55 U1.56 U1.60 U3.4 U4.4 U5.4 U7.4 U8.1 U8.4 U8.7 U9.1 U9.6 U10.2 U10.5 U12.5 U13.1 U13.2 U16.2 U16.5 U18.1 U18.2

## Polygon pours and split planes (outlines as drawn)
GND_EXT on Bottom Layer "GND_EXT_L04_P023" (solid, remove dead copper, pour order 23): 1448.4,1825.78 1448,1825.38 1448,1721 1491,1678 1670,1678 1689,1659 1689,1484 1818,1355 1965,1355 1965,1959 1962.08,1956.08 1807,1959 137,1962.85 137,1806 324.91,1806 357.13,1773.78 357.13,1599.92 653.08,1599.92 668,1585 813.13,1585 813.13,1825.78
VCC on Bottom Layer "VCC_L04_P032" (solid, remove dead copper, pour order 32): 1358,1809 1442,1809 1442,1717.93 1441.51,1717.43 1331.43,1717.43 1204,1590 1204,1546 1198.62,1540.62 1156,1540.62 1156,1607
3V3 on Bottom Layer "3V3_L04_P036" (solid, remove dead copper, pour order 36): 1753.47,1139.25 1762,1130.72 1762,1090 1753,1081 1666,1081 1652,1095 1539,1095 1539,1133.38 1539.09,1133.38 1546.33,1140.74
3V3_TPSM on Bottom Layer "3V3_TPSM_L04_P035" (solid, remove dead copper, pour order 35): 1595.78,770.3 1652.19,770.3 1656,774.11 1656,1070 1595.78,1070
NetD20_1 on Bottom Layer "NETD20_1_L04_P022" (solid, remove dead copper, pour order 22): 311,1800 297,1786 297,1736 310,1723 335,1723 335,1600 386,1600 386,1779 365,1800
VM_SENSE on Bottom Layer "VM_SENSE_L04_P020" (solid, remove dead copper, pour order 20): 135,1677 135,1602 136,1603 266,1603 266,1643 262,1647 211,1647 181,1677
NetF1_1 on Bottom Layer "NETF1_1_L04_P034" (solid, remove dead copper, pour order 34): 0,1684 1,1683 81,1683 95,1669 95,1610 128,1577 254,1577 254,1538 1,1538
5V on Bottom Layer "5V_L04_P033" (solid, remove dead copper, pour order 33): 1472.54,684.98 1471.52,684.98 1442.5,714 1442.5,750 1455.5,763 1457.5,763 1562.67,763 1570.5,755.17 1570.5,735 1550.5,715 1550.5,607.02 1558.53,599 1612,599 1612,586 1654,544 1654,434.5 1622.5,403 1483.5,403 1458.5,428 1415.5,428 1410.5,433 1410.5,523 1435.5,548 1474.77,548
GND on Bottom Layer "GND_BOTTOM" (solid, remove dead copper, pour order 38): 0,0 0,1968.5 1968.5,1968.5 1968.5,0
3V3 on Bottom Layer "3V3_L04_P031" (solid, remove dead copper, pour order 31): 1174,1435 1296,1435 1305,1444 1305,1479 1313,1487 1399,1487 1440,1487 1450,1477 1450,1454 1438,1442 1418,1442 1410,1434 1410,1419 1385,1394 1253,1394 1245,1402 1174,1402
SW_STS on Bottom Layer "SW_STS_L04_P029" (solid, remove dead copper, pour order 29): 1128,1811 1194.43,1811 1195,1811.57 1195,1656 1147,1608 1137,1608 1128,1617
SW_STS on Top Layer "SW_STS_L01_P021" (solid, remove dead copper, pour order 21): 1221.5,1707 1136.82,1707 1128,1698.18 1128,1622 1137,1613 1152,1613 1190,1651 1221.5,1651
GND_EXT on Top Layer "GND_EXT_L01_P025" (solid, remove dead copper, pour order 25): 1035.5,1826 1151,1826 1176,1801 1176,1740.07 1195,1721.69 1447.31,1721.69 1491,1678 1670,1678 1689,1659 1689,1484 1820,1353 1959,1353 1959,1968 1958,1969 1953.3,1964.3 1791.92,1964.3 167.5,1971 176.5,1962 176.5,1806 369,1806 392,1783 392,1599.5 653.9,1599.5 667.72,1585 799,1585 813.5,1599.5 813.5,1826
VM on Top Layer "VM_L01_P030" (solid, remove dead copper, pour order 30): 313.59,1594.97 645.96,1595.03 688,1553 704,1537 704,1494 688,1478 609,1478 594,1493 594,1531 342,1531 313,1560
NetD20_1 on Top Layer "NETD20_1_L01_P024" (solid, remove dead copper, pour order 24): 311,1643 355,1643 355,1716 376,1737 376,1789 365,1800 311,1800 310,1799 297,1786 297,1736 311,1722
5V on Top Layer "5V_L01_P028" (solid, remove dead copper, pour order 28): 1443,548 1464,548 1474,558 1498,582 1618,582 1654,546 1654,435 1622,403 1485,403 1460,428 1420,428 1411,437 1411,516
GND on Top Layer "GND_TOP" (solid, remove dead copper, pour order 37): 0,0 0,1968.5 1968.5,1968.5 1968.5,0
GND on Top Layer "GND_L01_P027" (solid, remove dead copper, pour order 27): 1292,1687 1311,1706 1363,1706 1376,1693 1376,1642 1362,1628 1305,1628 1292,1641
GND_EXT on Layer 1 "GND_EXT_L02_P026" (solid, remove dead copper, pour order 26): 2,1798 10,1806 368,1806 392,1782 392,1600 653,1600 668,1585 799,1585 814,1600 814,1826 1036,1826 1140,1722 1447,1722 1491,1678 1671,1678 1671,1677 1689,1659 1689,1484 1817,1356 1958,1356 1958,1959 1948.5,1968.5 0,1968.5
GND on Layer 1 "GND_MID1" (solid, remove dead copper, pour order 41): 0,0 0,1968.5 1968.5,1968.5 1968.5,0

## Other copper
Top Layer:
  pour cut-out: 307.32,1655.62 358,1655.62 358,1600 307.32,1600
Bottom Layer:
  pour cut-out: 185.44,1715.69 186.91,1714.22 186.91,1682.83 133.39,1682.83 128.03,1688.19 128.03,1706.6
  pour cut-out: 129.4,1596.51 260.49,1596.51 260.49,1591 260.49,1577 130.62,1577

## Silkscreen, mask and mechanical layers (free items; w line width, h text height)
Top Overlay:
  lines w6: 10,557 142,557 142,609 10,609 10,557 ; 22,1023 150,1023 150,1076 22,1076 22,1023 ; 75,1627 238,1627 238,1694 75,1694 75,1627 ; 666,33 790,33 790,91 666,91 666,33 ; 958,205 1366,205 1366,273 958,273 958,205 ; 1303,1332 1402,1332 1402,1389 1303,1389 1303,1332 ; 1633,1084 1749,1084 1749,1345 1633,1345 1633,1084 ; 1695,1477 1761,1477 1761,1706 1695,1706 1695,1477 ; 1710,353 1771,353 1771,508 1710,508 1710,353
  text "12V" at 908,1822 h26
  text "EN" at 777,1821 h26
  text "FAULT" at 599,1820 h26
  text "CANL" at 470,1819 h26
  text "CANH" at 334,1818 h26
  text "GND" at 1034,1817 h26
  text "MAIN" at 95,1642 h36
  text "BRAKE" at 1811,1552 h30 r90
  text "PEDALS" at 1747,1487 h36 r90
  text "GAS" at 1775,1374 h30 r90
  text "DRIVE" at 1816,1372 h30 r90
  text "SWD" at 1311,1344 h30
  text "IIN-" at 1797,1216 h30 r90
  text "INPUT" at 1681,1143 h36 r90
  text "CURRENT" at 1734,1095 h36 r90
  text "IIN+" at 1796,1089 h30 r90
  text "NRST" at 33,1033 h30
  text "H3" at 1811,906 h30 r90
  text "H2" at 1811,759 h30 r90
  text "H1" at 1814.26,639.09 h30 r90
  text "USER" at 21,567 h30
  text "GND" at 1812,474 h30 r90
  text "HALL" at 1758,367 h36 r90
  text "5V" at 1814,341 h30 r90
  text "ENCODER SPI" at 977,221 h36
  text "CS" at 872,151 h30
  text "SCK" at 1268,149 h30
  text "GND" at 1399,149 h30
  text "MOSI" at 975,147 h30
  text "MISO" at 1117,147 h30
  text "3.3V" at 1536,147 h30
  text "PWM" at 271,128 h26
  text "TACH" at 365,126 h26
  text "GND" at 483,125 h26
  text "5V" at 577,123 h26
  text "FAN" at 679,43 h36
Mechanical 1:
  the board outline again, w6